# EAGLE board LoraWAN_Platine_board (EAGLE 7.7.0)
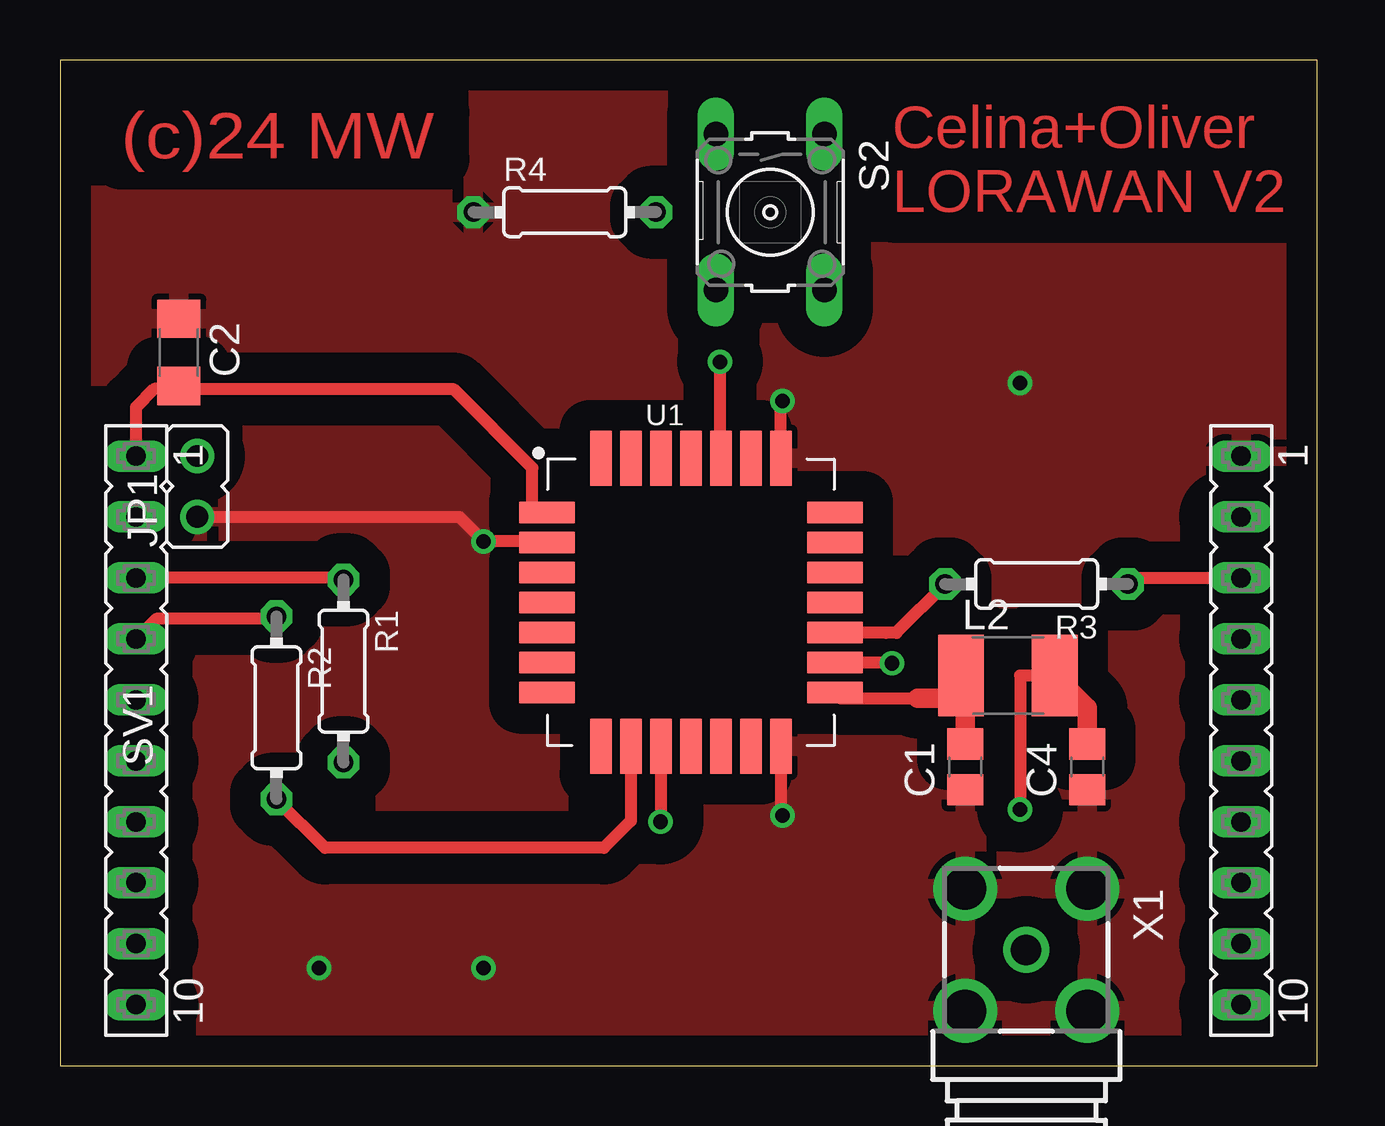
[diagram p0: board, top side]
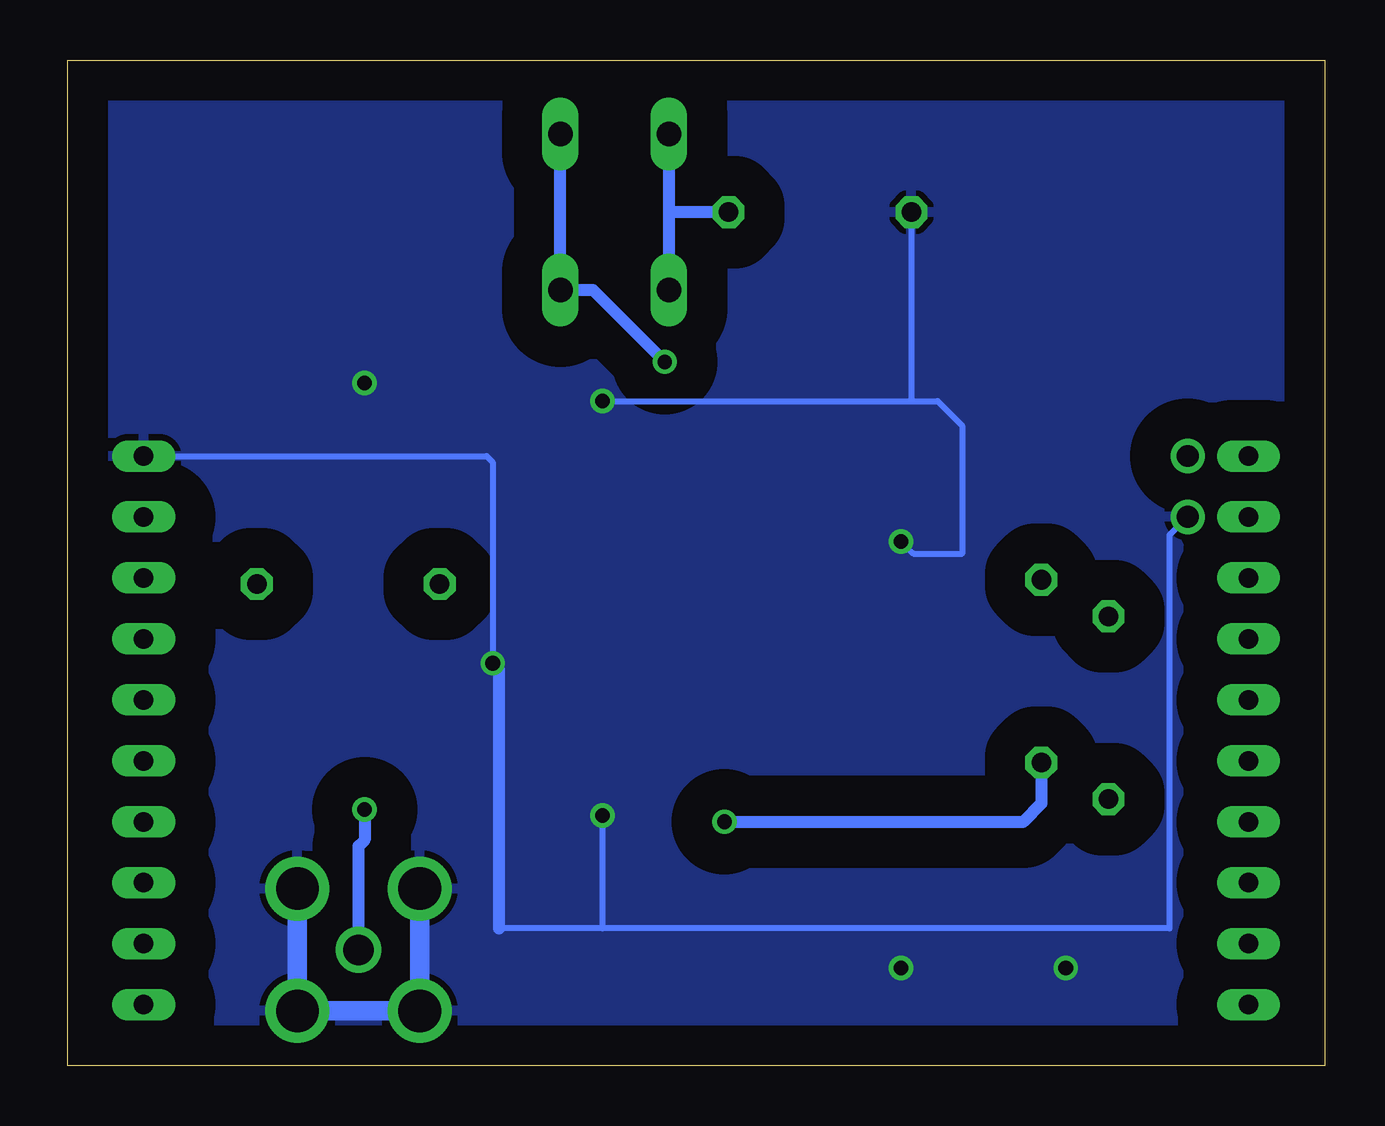
[diagram p1: board, bottom side, seen from below]

Size 52.38 x 41.9 mm. Coordinates in mm from the lower left corner, seen from the top.
Outline: 0,0 52.38,0 52.38,41.9 0,41.9 0,0
Copper layers (1*16): Top 0.035mm / dielectric 1.5mm / Bottom 0.035mm
Design rules "default": minimum track width 10mil, minimum drill 24mil, track to track 8mil, track to pad 8mil, pad to pad 8mil, via to via 8mil, smd to smd 8mil, copper to edge 40mil, drill to drill 8mil, minimum pad ring 10mil, minimum via ring 8mil, stop-mask expansion 4mil, vias tented up to drill 0mil, thermal gap 10mil

## Footprints (pad centres in the part's own frame; a part is rotated, then mirrored left to right if it is on the bottom)
C0805 = smd 1.3 x 1.5: 1 -0.95,0; 2 0.95,0
C1206 = smd 1.6 x 1.8: 1 -1.4,0; 2 1.4,0
JP1 = drill 0.914: 1 0,-1.27; 2 0,1.27
L1812 = smd 1.9 x 3.4: 1 -1.95,0; 2 1.95,0
0204/7 = drill 0.813 octagon: 1 -3.81,0; 2 3.81,0
B3F-10XX = drill 1.016 long: 1 -3.251,2.261; 2 3.251,2.261; 3 -3.251,-2.261; 4 3.251,-2.261
FE10 = drill 0.813 long: 1 -11.43,0; 2 -8.89,0; 3 -6.35,0; 4 -3.81,0; 5 -1.27,0; 6 1.27,0; 7 3.81,0; 8 6.35,0; 9 8.89,0; 10 11.43,0
MODULE28P-1.25-12X12X2.5MM = smd 2.3 x 0.9: 1 -6,3.75; 2 -6,2.5; 3 -6,1.25; 4 -6,0; 5 -6,-1.25; 6 -6,-2.5; 7 -6,-3.75; 15 6,-3.75; 16 6,-2.5; 17 6,-1.25; 18 6,0; 19 6,1.25; 20 6,2.5; 21 6,3.75 | smd 0.9 x 2.3: 8 -3.75,-6; 9 -2.5,-6; 10 -1.25,-6; 11 0,-6; 12 1.25,-6; 13 2.5,-6; 14 3.75,-6; 22 3.75,6; 23 2.5,6; 24 1.25,6; 25 0,6; 26 -1.25,6; 27 -2.5,6; 28 -3.75,6
BU-SMA-G = drill 1.27: 1 0,0 | drill 1.778: 2 -2.55,2.55; 3 2.55,2.55; 4 2.55,-2.55; 5 -2.55,-2.55

## Placement (x,y rotation side)
C1  nc  [C0805]  37.72,12.45 90 top
C2  4u7  [C1206]  4.95,29.72 270 top
C4  nc  [C0805]  42.8,12.45 90 top
JP1  [JP1]  5.72,24.13 0 top
L2  0  [L1812]  39.5,16.26 0 top
R1  22  [0204/7]  11.81,16.43 270 top
R2  22  [0204/7]  9.02,14.91 270 top
R3  22  [0204/7]  40.69,20.07 180 top
R4  1k  [0204/7]  21.03,35.56 0 top
S2  [B3F-10XX]  29.59,35.56 270 top
SV1  [FE10]  3.17,13.97 270 top
SV2  [FE10]  49.21,13.97 270 top
U1  [MODULE28P-1.25-12X12X2.5MM]  26.29,19.3 0 top
U$2  [PASSMARK]  -25.4,42.23 0 top  (outside the outline)
U$3  [PASSMARK]  -22.86,-17.78 0 top  (outside the outline)
U$4  [PASSMARK]  71.44,41.27 0 top  (outside the outline)
U$5  [PASSMARK]  70.8,-12.7 0 top  (outside the outline)
X1  BU-SMA-G  [BU-SMA-G]  40.26,4.83 270 top

## Library data of the parts
C1 C2 C4 = rcl; SPICEPREFIX: C
JP1 = jumper
L2 = rcl; SPICEPREFIX: L
R1-R4 = rcl; SPICEPREFIX: R
S2 = switch-omron; MPN: B3F-1000; OC_FARNELL: 176432; OC_NEWARK: 36M3542
SV1 SV2 = con-lsta
U1 = LORA-E5_Eagle_Library
U$2-U$5 = marks
X1 = con-coax; OC_FARNELL: unknown; OC_NEWARK: unknown

## Nets
+3V3: C2.2 SV1.1 U1.1
+5V: JP1.2
GND: C1.1 C2.1 C4.1 JP1.1 R4.1 SV2.1 U1.2 U1.14 U1.16 U1.22 X1.2 X1.3 X1.4 X1.5
N$1: C1.2 L2.1 U1.15
N$2: R2.2 U1.9
N$3: R2.1 SV1.4
N$4: R1.2 U1.10
N$5: R1.1 SV1.3
N$6: R3.2 U1.17
N$7: R3.1 SV2.3
N$8: C4.2 L2.2 X1.1
N$9: R4.2 S2.3 S2.4
N$12: S2.1 S2.2 U1.24

## Tracks (layer width: path | path; a pad name or v marks a point on that pad's centre or on a via)
+3V3
  Top 0.508: SV1.1 3.17,27.43 3.94,28.19 4.38,28.19 | 4.38,28.19 16.38,28.19 19.68,24.89 19.68,23.11 19.75,23.05 U1.1 | C2.2 4.38,28.19
GND  (via drill 0.61, 0.61 pad 0.55)
  Top 0.254: U1.2 20.25,21.84 | 30.04,27.63 v30.1,27.69 | 30.04,10.47 v30.1,10.41 | 34.63,16.8 v34.67,16.76
  Top 0.508: 20.25,21.84 v17.65,21.84 16.64,22.86 JP1.1 | U1.22 30.04,27.63 | U1.14 30.04,10.47 | U1.16 34.63,16.8
  Bottom 0.254: JP1.1 6.48,22.1 6.48,5.71 30.1,5.71 | 30.1,5.71 34.42,5.71 | v17.65,21.84 17.14,21.34 15.11,21.34 15.11,26.67 16.13,27.69 17.14,27.69 | v30.1,27.69 17.14,27.69 | v30.1,10.41 30.1,5.71 | SV2.1 34.93,25.4 34.67,25.15 v34.67,16.76 34.42,16.51 | R4.1 17.22,27.76 17.14,27.69
  Bottom 0.508: 34.42,16.51 34.42,5.71
  Bottom 0.813: X1.2 X1.3 X1.4 X1.5
  other vias: 42.81,2.28 10.8,4.06 17.65,4.06 40.01,28.45
  pour Bottom (isolate 1.676): -1.59,-3.49 54.29,-3.05 54.29,43.62 -1.59,43.81
  pour Top (isolate 1.27): 0,50.8 -0.32,-1.59 51.75,-1.59 52.07,50.8
N$1
  Top 0.254: U1.15 32.54,15.3
  Top 0.508: 32.54,15.3 35.75,15.3
  Top 0.813: C1.2 37.72,15.49 | 37.72,15.49 37.72,16.08 L2.1 | 35.75,15.3 37.53,15.3 37.72,15.49
N$2
  Top 0.508: R2.2 11.05,9.07 22.66,9.07 23.79,10.2 U1.9
N$3
  Top 0.254: R2.1 8.91,18.62
  Top 0.508: 8.91,18.62 4.01,18.62 SV1.4
N$4  (via drill 0.61 pad 0.55)
  Top 0.254: 25.04,10.18 v25.02,10.16
  Top 0.508: U1.10 25.04,10.18
  Bottom 0.508: v25.02,10.16 12.57,10.16 11.81,10.92 R1.2
N$5
  Top 0.254: R1.1 11.73,20.32
  Top 0.508: 11.73,20.32 SV1.3
N$6
  Top 0.508: R3.2 34.85,18.03 34.42,18.03 | 34.42,18.03 33.15,18.03 | U1.17 34.4,18.05 34.42,18.03
N$7
  Top 0.508: R3.1 44.76,20.32 SV2.3
N$8  (via drill 0.61)
  Top 0.508: v40.01,10.67 40.01,16.26 L2.2
  Top 0.813: C4.2 42.8,14.9 L2.2
  Bottom 0.508: X1.1 40.26,9.14 40.01,9.4 v40.01,10.67
N$9
  Bottom 0.508: S2.3 27.33,35.56 | 27.33,35.56 S2.4 | R4.2 27.33,35.56
N$12  (via drill 0.6)
  Top 0.254: U1.24 27.54,25.48 27.5,25.52
  Top 0.508: 27.5,25.52 v27.5,29.32
  Bottom 0.508: v27.5,29.32 30.49,32.31 S2.2 S2.1

## Text on the board
Top: top | (c)24 MW | Celina+Oliver / LORAWAN V2
Bottom: bottom
Document: 3v3 | 5v | GND | P1.0 | gnd | P2.6 | P1.1 | P2.7 | P1.2 | TST | P1.3 | RST | P1.4 | P1.7 | P1.5 | P1.6 | P2.0 | P2.5 | P2.1 | P2.4 | P2.2 | P2.3